# EAGLE board control board (EAGLE 9.7.0)
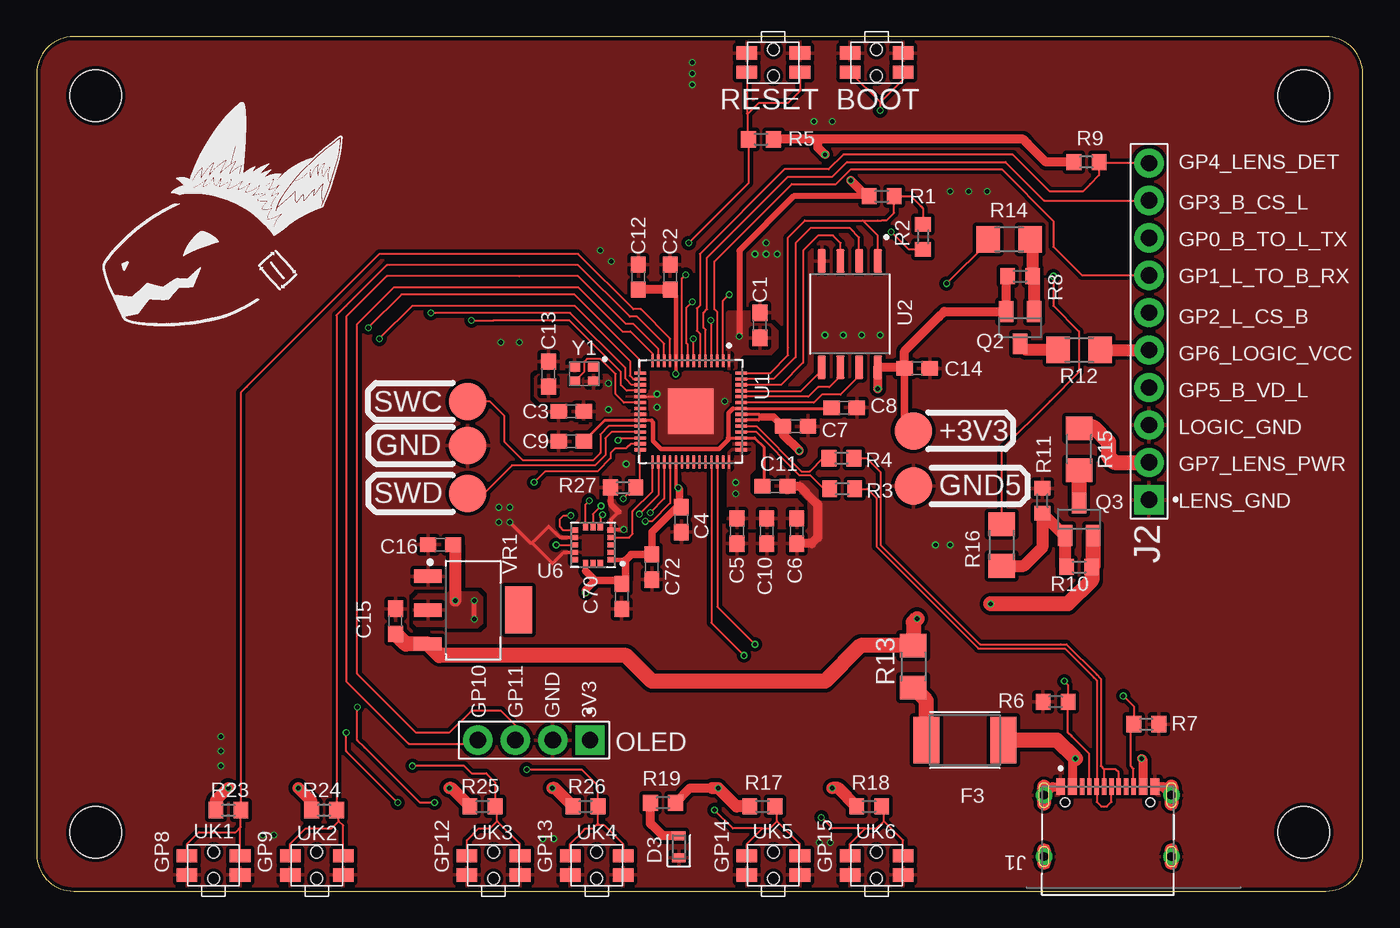
[diagram p0: board, top side]
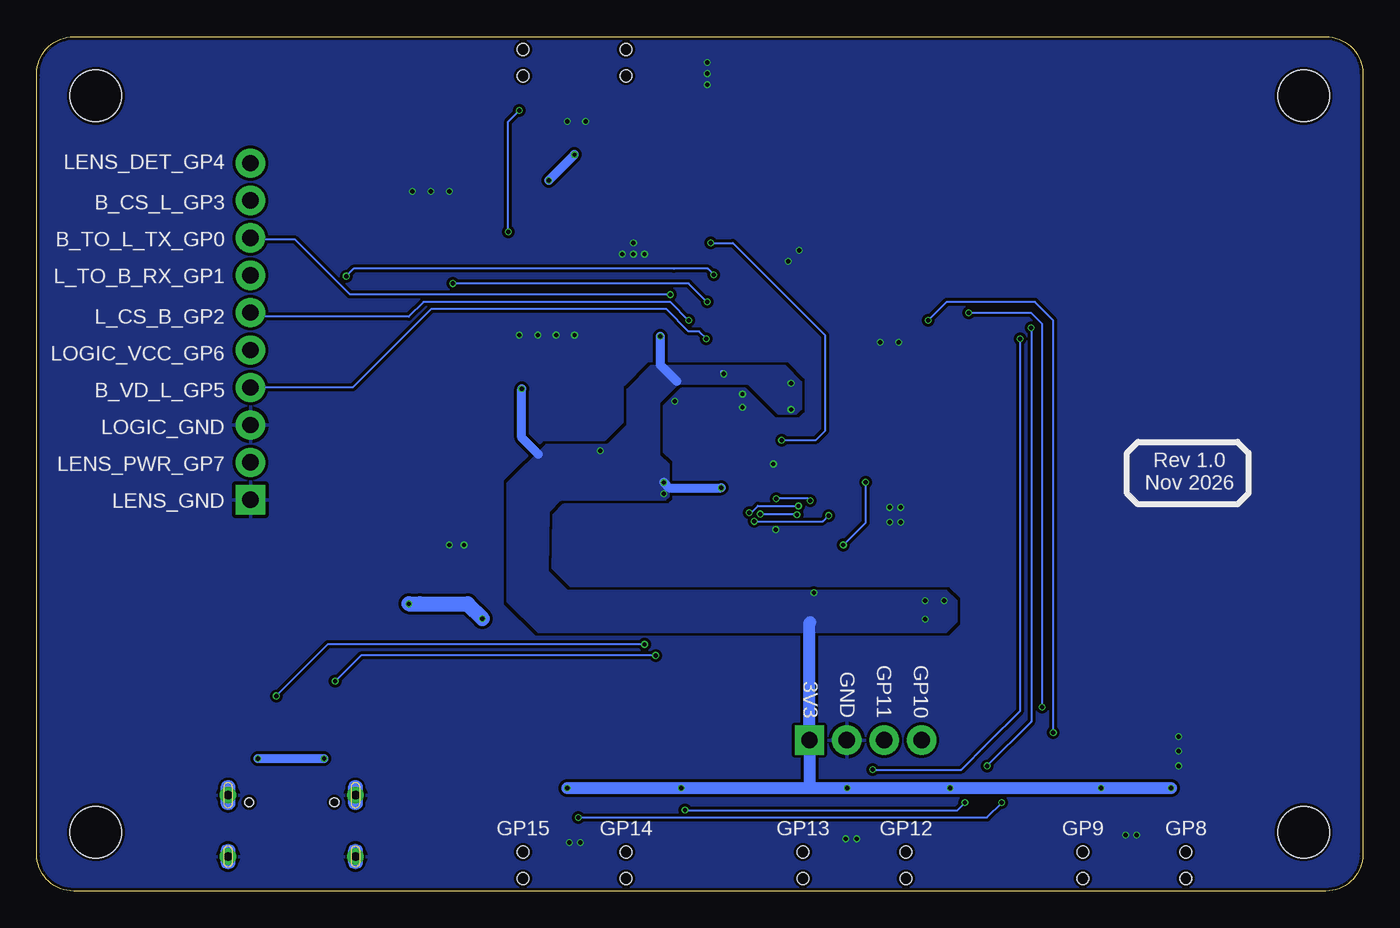
[diagram p1: board, bottom side, seen from below]

Size 90 x 58 mm. Coordinates in mm from the lower left corner, seen from the top.
Outline: 12.5,58 2.5,58 arc90 0,55.5 0,2.5 arc90 2.5,0 87.5,0 arc90 90,2.5 90,55.25 90,55.5 arc90 87.5,58 12.5,58
Copper layers (1*16): Top 0.035mm / dielectric 1.6mm / Bottom 0.035mm
Design rules "jlcpcb-2layers *": minimum track width 5mil, minimum drill 0.3mm, track to track 5mil, track to pad 5mil, pad to pad 5mil, via to via 5mil, smd to smd 5mil, copper to edge 0.2mm, drill to drill 6mil, minimum pad ring 10mil, minimum via ring 3mil, stop-mask expansion 0.038mm, vias tented up to drill 0.35mm, thermal gap 10mil
Holes 3.5 mm at 4,4 86,4 86,54 4,54

## Footprints (pad centres in the part's own frame; a part is rotated, then mirrored left to right if it is on the bottom)
B2,54 = smd 2.54 x 2.54: TP 0,0
SKSCLDE010 = smd 1.4 x 0.9: 1 -1.8,-0.65; 2 1.8,-0.65; 3 -1.8,0.65; 4 1.8,0.65 | hole 0.8: 0,0.9; 0,-0.9
C0603 = smd 1.1 x 1: 1 -0.85,0; 2 0.85,0
LEDC1608X35N_FLAT-B = smd 0.612 x 0.912: A 0.75,0; C -0.75,0
FUSC4532X125 = smd 1.78 x 3.15: 1 -2.615,0; 2 2.615,0
HRO_TYPE-C-31-M-12 = smd 0.6 x 1.14: A1_B12 -3.2,4.75; A4_B9 -2.4,4.75; B1_A12 3.2,4.75; B4_A9 2.4,4.75 | smd 0.3 x 1.14: A5 -1.25,4.75; A6 -0.25,4.75; A7 0.25,4.75; A8 1.25,4.75; B5 1.75,4.75; B6 0.75,4.75; B7 -0.75,4.75; B8 -1.75,4.75 | drill 0.6 pad 0.9: S1 -4.325,4.17; S2 4.325,4.17; S3 -4.325,0; S4 4.325,0 | hole 0.6: -2.89,3.68; 2.89,3.68
61301011121 = drill 1.1 square: 1 -11.43,0 | drill 1.1: 2 -8.89,0; 3 -6.35,0; 4 -3.81,0; 5 -1.27,0; 6 1.27,0; 7 3.81,0; 8 6.35,0; 9 8.89,0; 10 11.43,0
61300411121 = drill 1.1 square: 1 -3.81,0 | drill 1.1: 2 -1.27,0; 3 1.27,0; 4 3.81,0
SOT23 = smd 1 x 1.4: 1 -0.95,-1.1; 2 0.95,-1.1; 3 0,1.1
R0603 = smd 1 x 1.1: 1 -0.85,0; 2 0.85,0
R1206 = smd 1.6 x 1.803: 1 -1.422,0; 2 1.422,0
QFN40P700X700X90-57N = smd 0.84 x 0.2: 1 -3.435,2.6; 2 -3.435,2.2; 3 -3.435,1.8; 4 -3.435,1.4; 5 -3.435,1; 6 -3.435,0.6; 7 -3.435,0.2; 8 -3.435,-0.2; 9 -3.435,-0.6; 10 -3.435,-1; 11 -3.435,-1.4; 12 -3.435,-1.8; 13 -3.435,-2.2; 14 -3.435,-2.6; 29 3.435,-2.6; 30 3.435,-2.2; 31 3.435,-1.8; 32 3.435,-1.4; 33 3.435,-1; 34 3.435,-0.6; 35 3.435,-0.2; 36 3.435,0.2; 37 3.435,0.6; 38 3.435,1; 39 3.435,1.4; 40 3.435,1.8; 41 3.435,2.2; 42 3.435,2.6 | smd 0.2 x 0.84: 15 -2.6,-3.435; 16 -2.2,-3.435; 17 -1.8,-3.435; 18 -1.4,-3.435; 19 -1,-3.435; 20 -0.6,-3.435; 21 -0.2,-3.435; 22 0.2,-3.435; 23 0.6,-3.435; 24 1,-3.435; 25 1.4,-3.435; 26 1.8,-3.435; 27 2.2,-3.435; 28 2.6,-3.435; 43 2.6,3.435; 44 2.2,3.435; 45 1.8,3.435; 46 1.4,3.435; 47 1,3.435; 48 0.6,3.435; 49 0.2,3.435; 50 -0.2,3.435; 51 -0.6,3.435; 52 -1,3.435; 53 -1.4,3.435; 54 -1.8,3.435; 55 -2.2,3.435; 56 -2.6,3.435 | smd 3.1 x 3.1: 57 0,0
SOIC127P790X216-8N = smd 1.61 x 0.58: 1 -3.605,1.905; 2 -3.605,0.635; 3 -3.605,-0.635; 4 -3.605,-1.905; 5 3.605,-1.905; 6 3.605,-0.635; 7 3.605,0.635; 8 3.605,1.905
XDCR_LIS3DHTR = smd 0.45 x 0.35: 1 -1.225,1; 2 -1.225,0.5; 3 -1.225,0; 4 -1.225,-0.5; 5 -1.225,-1; 9 1.225,-1; 10 1.225,-0.5; 11 1.225,0; 12 1.225,0.5; 13 1.225,1 | smd 0.35 x 0.45: 6 -0.5,-1.225; 7 0,-1.225; 8 0.5,-1.225; 14 0.5,1.225; 15 0,1.225; 16 -0.5,1.225
SOT230P700X170-4 = smd 1.86 x 0.898: 1 -3.075,2.3; 2 -3.075,0; 3 -3.075,-2.3 | smd 1.86 x 3.189: 4 3.075,0
WE-SPXO_IQXO-540 = smd 0.75 x 0.65: 1 -0.65,-0.5; 2 0.65,-0.5; 3 0.65,0.5; 4 -0.65,0.5

## Placement (x,y rotation side)
+3V3  TPB2,54  [B2,54]  59.5,31.25 0 top
BOOT  [SKSCLDE010]  57,56.25 180 top
C1  100n  [C0603]  49.09,38.41 90 top
C2  100n  [C0603]  42.99,41.69 90 top
C3  100n  [C0603]  36.27,32.57 180 top
C4  100n  [C0603]  43.75,25.22 270 top
C5  100n  [C0603]  47.52,24.44 270 top
C6  100n  [C0603]  51.58,24.44 270 top
C7  100n  [C0603]  51.5,31.55 0 top
C8  100n  [C0603]  54.8,32.82 0 top
C9  100n  [C0603]  36.27,30.54 180 top
C10  1u  [C0603]  49.55,24.44 270 top
C11  1u  [C0603]  50.11,27.49 0 top
C12  10u  [C0603]  40.84,41.69 90 top
C13  100n  [C0603]  34.74,35.11 90 top
C14  100n  [C0603]  59.76,35.49 0 top
C15  10u  [C0603]  24.36,18.32 90 top
C16  10u  [C0603]  27.4,23.52 180 top
C70  100n  [C0603]  39.7,20 270 top
C72  10u  [C0603]  41.75,22 270 top
D3  LED_WHITE  [LEDC1608X35N_FLAT-B]  43.58,3 90 top
F3  1812L010  [FUSC4532X125]  63,10.25 180 top
GND  TPB2,54  [B2,54]  29.25,30.25 0 top
GND5  TPB2,54  [B2,54]  59.5,27.5 0 top
J1  TYPE-C-31-M-12  [HRO_TYPE-C-31-M-12]  72.69,2.35 0 top
J2  61301011121  [61301011121]  75.5,38 90 top
OLED  [61300411121]  33.75,10.25 180 top
Q2  SI2301CDS-T1-GE3  [SOT23]  66.75,38.25 180 top
Q3  SI2301CDS-T1-GE3  [SOT23]  70.75,25.25 0 top
R1  10k  [R0603]  57.34,47.17 180 top
R2  1K  [R0603]  60.15,44.41 90 top
R3  27R  [R0603]  54.67,27.31 0 top
R4  27R  [R0603]  54.62,29.39 0 top
R5  10k  [R0603]  49.16,51.04 0 top
R6  5.1k  [R0603]  69.15,12.85 0 top
R7  5.1k  [R0603]  75.32,11.33 180 top
R8  10k  [R0603]  66.75,41.75 180 top
R9  10k  [R0603]  71.25,49.5 180 top
R10  5.1k  [R0603]  70.75,22 180 top
R11  10k  [R0603]  68.25,26.5 270 top
R12  0  [R1206]  70.75,36.75 180 top
R13  0  [R1206]  59.5,15.25 90 top
R14  0  [R1206]  66,44.25 180 top
R15  0  [R1206]  70.75,30 270 top
R16  0  [R1206]  65.5,23.5 270 top
R17  10k  [R0603]  49.25,5.75 180 top
R18  10k  [R0603]  56.5,5.75 180 top
R19  5.1k  [R0603]  42.5,6 0 top
R23  10k  [R0603]  13,5.5 180 top
R24  10k  [R0603]  19.5,5.5 180 top
R25  10k  [R0603]  30.25,5.75 180 top
R26  10k  [R0603]  37.25,5.75 180 top
R27  10k  [R0603]  39.8,27.4 0 top
RESET  [SKSCLDE010]  50,56.25 180 top
SWC  TPB2,54  [B2,54]  29.25,33.25 0 top
SWD  TPB2,54  [B2,54]  29.25,27 0 top
U1  RP2040  [QFN40P700X700X90-57N]  44.39,32.57 270 top
U2  W25Q128JVSIQ  [SOIC127P790X216-8N]  55.19,39.17 270 top
U6  LIS3DHTR  [XDCR_LIS3DHTR]  37.75,23.5 180 top
U$2  CYCLESTARTV2MEDIUM  [CYCLESTARTV2MEDIUM]  13.5,45.75 0 top
UK1  [SKSCLDE010]  12,1.75 0 top
UK2  [SKSCLDE010]  19,1.75 0 top
UK3  [SKSCLDE010]  31,1.75 0 top
UK4  [SKSCLDE010]  38,1.75 0 top
UK5  [SKSCLDE010]  50,1.75 0 top
UK6  [SKSCLDE010]  57,1.75 0 top
VR1  NCP1117ST33T3G  [SOT230P700X170-4]  29.62,19.08 0 top
Y1  12MHz  [WE-SPXO_IQXO-540]  37.15,35.11 180 top

## Library data of the parts
+3V3 GND GND5 SWC SWD = testpad
BOOT RESET UK1-UK6 = alps; JLCPN: C115362
C1-C9 C13 C14 C70 = rcl; JLCPN: C14663; SPICEPREFIX: C
C10 C11 = rcl; JLCPN: C15849; SPICEPREFIX: C
C12 C15 C16 C72 = rcl; JLCPN: C19702; SPICEPREFIX: C
D3 = LED; CATEGORY: LED; COLOR: BLUE; DESCRIPTION: CHIP LED FLAT; JLCPN: C2290; SUB-CATEGORY: CHIP; TYPE: FLAT_TOP
F3 = Fuse; CATEGORY: FUSE; DESCRIPTION: Resettable PTCs; JLCPN: C127824; MANUFACTURER: Littlefuse; MPN: 1812L010; OPERATING_TEMPERATURE: -40°C to +85°C; PART_STATUS: ACTIVE; ROHS_COMPLIANCE: RoHS Compliant; SERIES: 1812L; SUBCATEGORY: Resettable; TYPE: PTC
J1 = SnapEDA Library; JLCPN: C165948; MANUFACTURER: HRO Electronics Co., Ltd.; MAXIMUM_PACKAGE_HEIGHT: 3.26 mm; PARTREV: 2020.12.08; SNAPEDA_PN: TYPE-C-31-M-12; STANDARD: Manufacturer Recommendations
J2 = Headers; CREATED_BY: PCBLayout.com; DIGIKEY_PART_NUMBER: 732-2670-ND; MANUFACTURER: Wurth Electronics Inc.; MPN: 61301011121
OLED = Headers; CREATED_BY: PCBLayout.com; DIGI_KEY_PART_NUMBER: 732-5317-ND; MANUFACTURER: Wurth Electronics Inc.; MPN: 61300411121
Q2 Q3 = Transistor; CATEGORY: Transistor; DESCRIPTION: MOSFET P-CH 30V 3A SOT-23; DRAIN_CURRENT: 3A; JLCPN: C10487; MANUFACTURER: Infineon Technologies; MPN: IRLML5203TRPBF; OPERATING_TEMP: -55°C ~ 150°C; PART_STATUS: Active; ROHS_COMPLIANT: Yes; SUB-CATEGORY: MOSFET; THERMALLOSS: 1.25W; TYPE: P-Channel
R1 R5 R8 R9 R11 R17 R18 R23-R27 = rcl; JLCPN: C25804; SPICEPREFIX: R
R2 = rcl; JLCPN: C21190; SPICEPREFIX: R
R3 R4 = rcl; JLCPN: C2907021; SPICEPREFIX: R
R6 R7 R10 R19 = rcl; JLCPN: C23186; SPICEPREFIX: R
R12-R16 = rcl; JLCPN: C17888; SPICEPREFIX: R
U1 = SnapEDA Library; JLCPN: C2040; MANUFACTURER: Raspberry Pi; MAXIMUM_PACKAGE_HEIGHT: 0.9 mm; PARTREV: 1.6.1; STANDARD: IPC 7351B
U2 = SnapEDA Library; JLCPN: C97521; MANUFACTURER: Winbond Electronics; PACKAGE: SOIC127P790X216-8N
U6 = LIS3DHTR; AVAILABILITY: In Stock; CHECK_PRICES: https://www.snapeda.com/parts/LIS3DHTR/STMicroelectronics/view-part/?ref=eda; DESCRIPTION: Accelerometer X, Y, Z Axis ±2g, 4g, 8g, 16g 0.5Hz ~ 625Hz 16-LGA (3x3); JLCPN: C15134; MF: STMicroelectronics; MP: LIS3DHTR; PACKAGE: LGA-16 STMicroelectronics; PRICE: None; PURCHASE-URL: https://www.snapeda.com/api/url_track_click_mouser/?unipart_id=278195&manufacturer=STMicroelectronics&part_name=LIS3DHTR&search_term=None; SNAPEDA_LINK: https://www.snapeda.com/parts/LIS3DHTR/STMicroelectronics/view-part/?ref=snap
U$2 = Logos
VR1 = IC_Power-Management; CATEGORY: IC_Power-Management; JLCPN: C6186; MANUFACTURER: ON Semiconductor; MPN: NCP1117ST33T3G; OPERATING_TEMP: 0 to +125 °C; PART_STATUS: Active; ROHS_COMPLIANT: RoHS3 Compliant; SERIES: NCP1117, NCV1117; SUB-CATEGORY: Voltage Regulator; TYPE: Linear
Y1 = Wurth_Quartz Crystals & Oscillators_WE-SPXO; DATASHEET-URL: https://www.we-online.com/catalog/datasheet/830208214609.pdf; JLCPN: C2901608; MOUNT: SMT; PART-NUMBER: 830208214609; STABILITY: 25ppm; V-SUPPLY: 3.3V

## Nets
+1V1: C8.1 C9.1 C11.1 U1.23 U1.45 U1.50
+3.3V: +3V3.TP C1.1 C2.1 C3.1 C4.1 C5.1 C6.1 C7.1 C10.1 C12.1 C13.1 C14.1 C16.1 C70.1 C72.1 OLED.1 Q2.2 R1.2 R5.2 R8.2 R9.2 R17.2 R18.2 R19.2 R23.2 R24.2 R25.2 R26.2 U1.1 U1.10 U1.22 U1.33 U1.42 U1.43 U1.44 U1.48 U1.49 U2.8 U6.1 U6.14 VR1.2 Y1.4
+5V: C15.1 Q3.2 R10.1 R13.2 VR1.3
AC_CK: U1.29 U6.4
AC_CS: R27.2 U1.28 U6.8
AC_INT0: U1.27 U6.11
AC_INT1: U1.32 U6.9
AC_SDI: U1.30 U6.6
AC_SDO: U1.31 U6.7
B_CS_L: J2.9 U1.5
B_TO_L_TXD: J2.8 U1.2
BODY_VD_LENS: J2.4 U1.7
GND: BOOT.1 BOOT.2 C1.2 C2.2 C3.2 C4.2 C5.2 C6.2 C7.2 C8.2 C9.2 C10.2 C11.2 C12.2 C13.2 C14.2 C15.2 C16.2 C70.2 C72.2 D3.C GND5.TP GND.TP J1.A1_B12 J1.B1_A12 J1.S1 J1.S2 J1.S3 J1.S4 J2.1 J2.3 OLED.2 R6.1 R7.1 R11.1 R27.1 RESET.1 RESET.2 U1.19 U1.57 U2.4 U6.5 U6.10 U6.12 UK1.1 UK1.2 UK2.1 UK2.2 UK3.1 UK3.2 UK4.1 UK4.2 UK5.1 UK5.2 UK6.1 UK6.2 VR1.1 Y1.2
L_CS_B: J2.6 U1.4
L_TO_B_RXD: J2.7 U1.3
LENS_DET: J2.10 R9.1 U1.6
LENS_PWR: J2.2 R15.1
LOGIC_VCC: J2.5 R12.1
N$1: D3.A R19.1
N$2: R14.2 U1.8
N$3: BOOT.3 BOOT.4 R2.1
N$4: R16.1 U1.9
N$5: R5.1 RESET.3 RESET.4 U1.26
N$6: Q2.3 R12.2
N$7: Q2.1 R8.1 R14.1
N$8: Q3.3 R15.2
N$9: Q3.1 R10.2 R11.2 R16.2
N$10: R17.1 U1.17 UK5.3 UK5.4
N$11: R18.1 U1.18 UK6.3 UK6.4
N$17: F3.1 J1.A4_B9 J1.B4_A9
N$20: R23.1 U1.11 UK1.3 UK1.4
N$108: R24.1 U1.12 UK2.3 UK2.4
N$109: R25.1 U1.15 UK3.3 UK3.4
N$110: R26.1 U1.16 UK4.3 UK4.4
OLSCL: OLED.3 U1.14
OLSDA: OLED.4 U1.13
QSPI_SCLK: U1.52 U2.6
QSPI_SD0: U1.53 U2.5
QSPI_SD1: U1.55 U2.2
QSPI_SD2: U1.54 U2.3
QSPI_SD3: U1.51 U2.7
QSPI_SS: R1.1 R2.2 U1.56 U2.1
SWCLK: SWC.TP U1.24
SWD: SWD.TP U1.25
USB1_N: R3.1 U1.46
USB1_P: R4.1 U1.47
USB2_N: J1.A7 J1.B7 R3.2
USB2_P: J1.A6 J1.B6 R4.2
USBCC1: J1.A5 R6.2 U1.39
USBCC2: J1.B5 R7.2 U1.40
VUSB: F3.2 R13.1
XIN: U1.20 Y1.3

## Tracks (layer width: path | path; a pad name or v marks a point on that pad's centre or on a via)
+1V1
  Top 0.203: C8.1 53.9,32.77 U1.50 47.26,32.77 | C9.1 38.56,31.97 U1.23 41.69,31.97 41.72,31.93 | C11.1 49.34,27.58 49.34,30.16 48.73,30.77 U1.45 46.95,30.77 46.91,30.77
  Top 0.305: 41.72,31.93 41.83,31.83 41.83,30.56 42.38,30.01 46.3,30.01 46.95,30.66 46.95,30.77 | 47.26,32.77 46.95,32.47 46.95,30.81 46.91,30.77
+3.3V  (via drill 0.3)
  Top 0.203: U1.49 49.04,32.37 49.22,32.19 49,31.97 U1.48 | 43.64,26.18 C4.1 | 43.39,40.44 C2.1 | U1.44 U1.43 | v43.38,35.11 43.39,35.12
  Top 0.254: U1.33 43.39,28.12 43.39,27.37 v43.55,27.37 | 43.39,35.12 U1.10
  Top 0.305: U1.10 43.39,40.44 | C4.1 43.45,26.07 | U6.1 39.95,22.5 40,22.5 | 40.25,22.75 40.35,22.85 | 39.45,21.1 C70.1 39.95,21.1 | U6.14 37.25,21.75 | v29.69,19.71 v29.69,18.46
  Top 0.406: R1.2 51.38,47.17 47.69,43.48 v47.69,37.67
  Top 0.508: v43.55,27.37 43.64,27.28 43.64,26.18 | 49.22,32.19 50.02,32.19 C7.1 | 43.45,26.07 41.75,24.37 C72.1 40.35,22.85 | 40.25,22.75 40,22.5 | 37.25,21.75 37.9,21.1 | 39.45,21.1 37.9,21.1 | 39.95,22.5 39.95,21.1 | 37.9,21.1 37.25,20.45 v37.25,20.25 | C14.1 58.91,31.84 +3V3.TP
  Top 0.61: C2.1 C12.1 | C7.1 50.65,31.01 v51.76,29.9 | v57.09,34.09 U2.8 58.83,35.57 C14.1 58.91,36.66 61.25,39 61.6,39.35 Q2.2 65.8,41.65 R8.2 | 56.65,47.33 R1.2 56.33,47.17 v55.25,48.25 | R9.2 68.5,49.5 67.25,50.75 66.96,51.04 53,51.04 | 53,51.04 R5.2 | 53,51.04 53,50.5 v53.5,50 | R19.2 44.35,7 45.85,7
  Top 0.813: C16.1 28.42,23.36 v28.42,19.71 | R18.2 54.4,7 v54,7 | v13,7 12.15,6.15 R23.2 | R24.2 18.65,6.1 v17.75,7 | R25.2 28.15,7 v28,7 | R26.2 35.15,7 v35,7 | 45.85,7 v46.25,7 47.5,5.75 R17.2
  Bottom 0.305: 43.5,35.24 v43.38,35.11
  Bottom 0.61: 55.95,29.65 57.09,30.79 v57.09,34.09 | v47.69,37.67 47.69,35.74 46.55,34.6 | v47.44,27.74 47.07,27.37 v43.55,27.37 | v53.5,50 v55.25,48.25
  Bottom 0.813: v54,7 v46.25,7 37.5,7 | 37.5,7 v35,7 v28,7 v17.75,7 v13,7 | 37.5,7 37.56,7.06 OLED.1 37.56,18.19 37.5,18.25
  other vias: 38.8,34.47 47.44,26.98 38.8,32.7
  pour Top (isolate 0.152): 47.26,30.14 47.25,30.11 46.88,29.74 46.88,25.23 47.47,24.64 52.02,24.64 52.02,26.18 51.6,26.6 48.84,26.6 48.82,26.61 48.39,27.03 48.38,27.06 48.38,28.27 48.39,28.29 48.76,28.66 48.76,30.25 48.42,30.59 47.34,30.59 47.26,30.51
  pour Top (rank 2): 49.83,38.48 49.07,38.48 49.04,38.52 49.04,39.02 48.69,39.38 46.95,39.38 46.73,39.15 46.73,35.51 46.83,35.41 47.42,35.41 47.52,35.51 47.52,36.02 47.93,36.43 49.83,36.43 50.3,36.9 50.3,38.01
  pour Bottom (isolate 0.254): 55.29,21.69 54.04,20.44 54.02,20.42 28.28,20.42 27.58,19.72 27.58,18.28 28.29,17.57 55.95,17.57 58.03,19.65 58.03,27.71 55.41,30.33 51.23,30.33 51.21,30.35 49.91,31.64 49.9,31.66 49.9,34.06 48.3,35.67 39.22,35.67 38.12,34.57 38.12,32.73 38.45,32.39 39.66,32.39 41.68,34.41 41.71,34.42 46.44,34.42 46.47,34.41 47.76,33.12 47.77,33.09 47.77,29.63 47.76,29.6 47.13,28.98 47.13,26.76 47.34,26.55 54.44,26.55 54.47,26.54 55.24,25.77 55.25,25.76 55.25,25.75 55.25,25.75 55.26,25.74 55.26,25.73 55.26,25.73 55.26,25.73 55.26,25.71 55.33,21.77 55.33,21.77 55.33,21.75 55.33,21.74 55.33,21.74 55.33,21.73 55.32,21.72 55.32,21.71 55.31,21.71 55.31,21.71 55.3,21.7 55.29,21.69
  pour Top: 36.34,33.25 36.35,33.22 36.35,32.09 36.43,32.01 39.02,32.01 39.14,32.13 39.17,32.14 41.31,32.14 41.39,32.22 41.39,32.54 41.31,32.62 40.18,32.62 40.16,32.63 39.12,33.67 39.11,33.7 39.11,34.7 38.77,35.03 34.01,35.03 33.8,34.82 33.8,33.62 34.14,33.28 36.29,33.28 36.31,33.27
  pour Top: 27.8,18.01 27.83,18 27.94,17.89 29.91,17.89 30.25,18.22 30.25,19.94 29.91,20.27 27.94,20.27 27.83,20.16 27.8,20.15 25.91,20.15 25.58,19.81 25.58,18.22 25.78,18.01
+5V  (via drill 0.3)
  Top 0.61: 71.7,22.1 R10.1
  Top 1.016: Q3.2 71.7,22.1 | R10.1 71.6,21.1 70,19.5 65.5,19.5 v64.75,19.5 | v59.75,18.5 59.5,18.25 R13.2 55.92,16.67 53.5,14.25 41.75,14.25 40,16 27.33,16 VR1.3 25.04,16.78 C15.1
  Bottom 1.016: v64.75,19.5 64,19.5 60.75,19.5 v59.75,18.5
AC_CK
  Top 0.152: U6.4 40.2,24 40.45,24.25 40.45,25.8 41.79,27.14 U1.29
AC_CS  (via drill 0.3)
  Top 0.152: U6.8 37.25,26.25 v37.5,26.5 | v39.8,26.65 40.55,27.4 R27.2 40.96,27.71 U1.28
  Bottom 0.152: v37.5,26.5 37.65,26.65 v39.8,26.65
AC_INT0  (via drill 0.3)
  Top 0.152: U1.27 40.32,30.37 40.05,30.1 40,30.05 39.25,30.05 38.95,29.75 38.95,29.5 38.95,29.4 38.05,28.5 34.5,28.5 v33.75,27.75 | v35.25,23.5 U6.11
  Bottom 0.152: v33.75,27.75 33.75,25 v35.25,23.5
AC_INT1  (via drill 0.3)
  Top 0.152: U1.32 42.99,26.34 41.75,25.1 v41.3,25.1 | U6.9 35.75,24.5 35.5,24.75 35.5,25.25 35.75,25.5 v36.25,25.5
  Bottom 0.152: v41.3,25.1 36.65,25.1 v36.25,25.5
AC_SDI  (via drill 0.3)
  Top 0.152: U1.30 42.19,26.89 v40.9,25.6 | v38.4,25.55 38.25,25.4 U6.6
  Bottom 0.152: v40.9,25.6 38.45,25.6 v38.4,25.55
AC_SDO  (via drill 0.3)
  Top 0.152: U1.31 42.59,26.64 v41.65,25.7 | v38.3,26.15 37.75,25.6 U6.7
  Bottom 0.152: v41.65,25.7 41.5,25.7 41.05,26.15 v38.3,26.15
B_CS_L
  Top 0.152: U1.5 45.39,38.11 45.25,38.25 45.25,39.25 45.5,39.5 45.5,43 51,48.5 54,48.5 55,49.5 65.75,49.5 68.36,46.89 J2.9
B_TO_L_TXD  (via drill 0.3)
  Top 0.152: U1.2 46.59,40.09 v47,40.5
  Bottom 0.152: J2.8 75.4,44.25 72.75,44.25 72.5,44.25 68.75,40.5 v47,40.5
BODY_VD_LENS  (via drill 0.3)
  Top 0.152: U1.7 44.59,37.46 v44.55,37.5
  Bottom 0.152: v44.55,37.5 45.05,38 45.75,38 47.25,39.5 63.25,39.5 64.5,38.25 68.56,34.19 J2.4
GND  (via drill 0.3)
  Top 0.152: U1.19 41.92,33.57 v42.1,33.75
  Top 0.254: 39.5,25.75 38.98,25.23 U6.5 39.02,24.55 v39.85,24.55 | U6.10 35.5,24 34.75,24.75 33.62,23.62 | 33.62,23.62 35,22.25 35.75,23 U6.12 | 33.62,23.62 33.52,23.62 v32.1,25.05
  Top 0.406: R27.1 38.95,26.3 39.5,25.75
  Top 0.61: J1.S2 76.44,7.1 J1.B1_A12 | J1.S1 68.95,7.1 J1.A1_B12 | C11.2 51.76,27.49 52.75,26.5 53,26.25 53,24 52.59,23.59 C6.2
  other vias: 49.5,43.25 50.25,43.25 48.75,43.25 49.5,44 42.1,32.85 46.7,33.25 53.5,37.75 54.75,37.75 56,37.75 57.25,37.75 62,47.5 63.25,47.5 64.5,47.5 40,29 31.35,25.05 31.35,26.05 32.1,26.05 15.35,3.8 16.1,3.8 34.35,3.55 35.1,3.55 53.85,3.3 53.1,3.3 44.5,56.25 44.5,55.5 44.5,54.75 12.5,8.5 12.5,9.5 12.5,10.5 61,23.5 62,23.5 52.75,52.25 54,52.25 39,42.75 38.25,43.5 32.75,37.25 31.5,37.25
  pour Top (isolate 0.152, rank 2, no thermals): 41.53,33.12 41.55,33.09 41.55,30.06 41.76,29.85 46.26,29.85 46.98,30.57 46.98,35.16 41.67,35.16 41.67,34.08 41.66,34.05 41.39,33.77 41.36,33.76 40.53,33.76 40.53,33.41 41.23,33.41 41.26,33.4
  pour Top (isolate 0.254, rank 6): -3.62,-2.87 92.83,-2.87 92.83,44.29 92.73,60.12 -3.62,60.12
  pour Bottom (isolate 0.2, rank 6): -1.3,-1.42 90.92,-1.42 90.92,58.92 -1.67,58.92 -1.3,17.14 -1.3,17.14 -1.3,17.13 -1.3,17.11 -1.3,17.11
L_CS_B  (via drill 0.3)
  Top 0.152: U1.4 45.79,38.71 v45.75,38.75
  Bottom 0.152: v45.75,38.75 47,40 63.75,40 64.75,39 75.48,39 J2.6
L_TO_B_RXD
  Top 0.152: U1.3 46.19,39.31 46,39.5 46,42.75 46.19,42.94 51.25,48 54.25,48 55.25,49 65.5,49 69,45.5 69,43.75 70.94,41.81 J2.7
LENS_DET
  Top 0.152: J2.10 72.17,49.43 R9.1 72.1,48.6 71.5,48 71,47.5 68.75,47.5 66.25,50 54.75,50 53.75,49 50.75,49 45,43.25 45,39.75 44.8,39.55 44.8,38.05 45,37.85 45,36.01 U1.6
LENS_PWR
  Top 0.813: 70.83,31.5 R15.1
  Top 1.016: 70.83,31.5 71.75,31.5 72.75,30.5 72.75,29.5 73.14,29.11 J2.2
LOGIC_VCC
  Top 0.813: 72.44,36.48 R12.1 75.48,36.75 J2.5
N$1
  Top 0.61: D3.A 42.49,3.75 41.75,4.5 41.65,4.6 R19.1
N$2  (via drill 0.3)
  Top 0.152: U1.8 44.19,37.11 44.1,37.2 44.1,39.6 v44.5,40 | v61.75,41.25 64.58,44.08 R14.2
  Bottom 0.152: v44.5,40 45.75,41.25 v61.75,41.25
N$3  (via drill 0.3)
  Top 0.152: R2.1 59.19,43.56 v58,44.75 | v57.25,53 57.25,53.55 | BOOT.3 58.8,55.1 57.25,53.55 | BOOT.4 57.25,53.55
  Bottom 0.152: v58,44.75 58,52.25 v57.25,53
N$4  (via drill 0.3)
  Top 0.152: U1.9 43.79,41.59 v44.05,41.85 | v69,41.75 69,39.75 70.75,38 70.75,35.25 68.75,33.25 65.5,30 R16.1
  Bottom 0.152: v44.05,41.85 44.45,42.25 46.75,42.25 68.5,42.25 v69,41.75
N$5  (via drill 0.3)
  Top 0.152: RESET.3 51.8,54.3 51,53.5 49,53.5 48.25,52.75 | 48.25,52.75 48.25,51.09 R5.1 48.3,48.05 v44.25,44 | RESET.4 48.2,52.8 48.25,52.75 | v39.45,30.6 39.62,30.77 U1.26
  Bottom 0.152: v44.25,44 42.75,44 36.5,37.75 36.5,31.25 37.15,30.6 v39.45,30.6
N$6
  Top 0.813: R12.2 67.15,36.75 Q2.3
N$7
  Top 0.813: Q2.1 67.7,41.65 R8.1 67.6,44.07 R14.1
N$8
  Top 1.016: R15.2 Q3.3
N$9
  Top 0.813: R16.2 67,22.08 68.25,23.33 R11.2 69.75,24.15 Q3.1 69.8,22.1 R10.2
N$10  (via drill 0.3)
  Top 0.152: UK5.3 48.2,3.2 49.25,4.25 | 49.25,4.25 49.75,4.25 50.25,4.75 | 50.25,4.75 50.25,5.6 R17.1 | UK5.4 51.8,3.2 50.25,4.75 | U1.17 40.38,34.37 40,34.75 39.95,34.8 39.95,35.5 36.2,39.25 31,39.25 v26.75,39.25 | 49.25,4.25 47.25,4.25 v46,5.5 | v27,6 26,6 22.25,9.75 21.75,10.25 v21.75,12.5
  Bottom 0.152: v46,5.5 27.5,5.5 v27,6 | v21.75,12.5 21.75,38.5 22.5,39.25 v26.75,39.25
N$11  (via drill 0.3)
  Top 0.152: UK6.3 55.2,3.2 56.25,4.25 | 56.25,4.25 57,4.25 57.5,4.75 | 57.5,4.75 57.5,5.6 R18.1 | UK6.4 58.8,3.45 57.5,4.75 | U1.18 40.03,33.97 39.65,34.35 39.65,35.25 36.15,38.75 31,38.75 v29.5,38.75 | 56.25,4.25 54,4.25 v53.25,5 | v24.5,6 21,9.5 v21,10.75
  Bottom 0.152: v53.25,5 27.5,5 25.5,5 v24.5,6 | v21,10.75 21,38.75 22.25,40 28.25,40 v29.5,38.75
N$17  (via drill 0.3)
  Top 0.61: J1.B4_A9 75.09,8.9 v75,9 | v70.5,9 70.3,8.79 J1.A4_B9
  Top 1.016: v70.5,9 69.25,10.25 F3.1
  Bottom 0.61: v75,9 v70.5,9
N$20
  Top 0.152: UK1.3 10.2,3.2 11,4 13.5,4 13.85,4.35 | 13.85,4.35 R23.1 13.85,33.85 14.25,34.25 23.25,43.25 36.75,43.25 40.5,39.5 41,39.5 42.99,37.51 U1.11 | UK1.4 13.8,4.3 13.85,4.35
N$108
  Top 0.152: UK2.3 17.2,3.2 18.25,4.25 20,4.25 20.5,4.75 | 20.5,4.75 20.5,5.35 R24.1 20.35,39.1 21,39.75 23.75,42.5 36.75,42.5 40.25,39 40.75,39 42.59,37.16 U1.12 | UK2.4 20.8,4.45 20.5,4.75
N$109  (via drill 0.3)
  Top 0.152: UK3.3 29.2,3.45 30,4.25 30.75,4.25 31.25,4.75 | 31.25,4.75 31.25,5.6 R25.1 31.1,7.4 31,7.5 30.5,8 29.5,8 29,8.5 v25.5,8.5 | UK3.4 32.8,3.2 31.25,4.75 | U1.15 40.96,36.04 39.5,37.5 36.5,40.5 24.75,40.5 v22.5,38.25
  Bottom 0.152: v22.5,38.25 22.5,11.5 v25.5,8.5
N$110  (via drill 0.3)
  Top 0.152: UK4.3 36.2,3.2 37,4 37.25,4.25 37.75,4.25 38,4.5 | 38,4.5 38.1,4.6 R26.1 38.1,7.15 37,8.25 v33.25,8.25 | 38,4.5 38.5,4.5 39.75,3.25 39.8,3.2 UK4.4 | v23.25,37.5 25.5,39.75 36,39.75 36.5,39.75 40.25,36 40.25,35 40.5,34.75 40.94,34.75 U1.16
  Bottom 0.152: v33.25,8.25 27.25,8.25 25.5,10 23.25,12.25 v23.25,37.5
OLSCL
  Top 0.152: OLED.3 32.48,11.27 31.5,12.25 29.5,12.25 28,10.75 25.75,10.75 21.75,14.75 21.75,38.5 24.25,41 36.75,41 39.75,38 40.3,38 41.79,36.5 U1.14
OLSDA
  Top 0.152: U1.13 42.19,36.81 40.5,38.5 40,38.5 36.75,41.75 32.75,41.75 23.75,41.75 21,39 21,14.25 25.25,10 29.69,10 OLED.4
QSPI_SCLK
  Top 0.152: U2.6 54.55,34.98 53.79,34.22 53.03,34.22 52.38,33.57 U1.52
QSPI_SD0
  Top 0.152: U1.53 51.88,33.97 52.52,34.6 53.28,35.36 U2.5
QSPI_SD1
  Top 0.152: U2.2 55.82,44.38 55.19,45.02 52.52,45.02 51.5,44 51.5,36.25 50.02,34.77 U1.55
QSPI_SD2
  Top 0.152: U2.3 54.55,44 54.04,44.51 53.03,44.51 52.01,43.49 52.01,35.87 50.51,34.37 U1.54
QSPI_SD3
  Top 0.152: U2.7 55.82,34.98 54.55,33.71 53.28,33.71 52.74,33.17 U1.51
QSPI_SS
  Top 0.152: 56.08,45.52 52.14,45.52 50.99,44.38 50.99,36.89 50.99,36.38 49.78,35.17 U1.56 | 56.08,45.52 57.09,45.52 57.34,45.52 57.69,45.52 58.2,46.03 R1.1 59.33,47.17 60,46.5 60.15,46.35 R2.2 | U2.1 57.09,44.51 56.08,45.52
SWCLK
  Top 0.152: U1.24 38.82,31.57 38.25,31 38.25,29.75 37.75,29.25 33,29.25 31.75,30.5 31.75,32.25 30.75,33.25 SWC.TP
SWD
  Top 0.152: U1.25 39.02,31.17 38.6,30.75 38.6,29.6 37.9,28.9 32.25,28.9 30.35,27 SWD.TP
USB1_N
  Top 0.152: U1.46 48.84,31.17 51.78,28.23 52.51,28.23 53.42,27.31 R3.1
USB1_P
  Top 0.152: U1.47 48.83,31.57 51.9,28.5 52.48,28.5 53.37,29.39 R4.1
USB2_N
  Top 0.152: R3.2 56.38,27.31 57,26.69 57,23.5 57,23.38 63.91,16.47 69.5,16.47 69.78,16.47 71.75,14.5 71.94,14.3 J1.B7 71.94,6.05 72.25,5.75 72.65,5.75 72.94,6.04 J1.A7
USB2_P
  Top 0.152: R4.2 56.33,29.39 57.28,28.44 57.28,23.5 64.03,16.75 69.5,16.75 69.89,16.75 71.95,14.7 72.22,14.42 72.22,8.5 72.44,8.28 | 72.44,8.28 J1.A6 | J1.B6 73.44,8.05 73.25,8.25 73.22,8.28 72.44,8.28
USBCC1  (via drill 0.3)
  Top 0.152: J1.A5 71.44,9.3 70.25,10.5 70,10.75 70,12.75 | 70,12.75 R6.2 | U1.39 45.79,18.21 v48,16 | v69.75,14.25 70,14 70,12.75
  Bottom 0.152: v48,16 68,16 v69.75,14.25
USBCC2  (via drill 0.3)
  Top 0.152: J1.B5 74.44,8.3 74.25,8.5 74.25,11.12 R7.2 74.47,12.53 v73.75,13.25 | U1.40 46.19,19.31 v48.75,16.75
  Bottom 0.152: v48.75,16.75 70.25,16.75 v73.75,13.25
VUSB
  Top 1.016: F3.2 60.38,12.94 R13.1
XIN
  Top 0.152: U1.20 39.85,33.17 39.29,33.74 39.29,35.11 38.26,36.14 37.34,36.14 37.13,35.92 37.13,35.24 Y1.3

## Text on the board
tPlace: GP4_LENS_DET | GP3_B_CS_L | GP0_B_TO_L_TX | GP1_L_TO_B_RX | GP2_L_CS_B | GP6_LOGIC_VCC | GP5_B_VD_L | LOGIC_GND | GP7_LENS_PWR | LENS_GND | GP10 | GP11 | GND | 3V3 | GP8 | GP9 | GP12 | GP13 | GP14 | GP15
bPlace: LENS_DET_GP4 | B_CS_L_GP3 | B_TO_L_TX_GP0 | L_TO_B_RX_GP1 | L_CS_B_GP2 | LOGIC_VCC_GP6 | B_VD_L_GP5 | LOGIC_GND | LENS_PWR_GP7 | Rev 1.0 / Nov 2026 | LENS_GND | GP10 | GP11 | GND | 3V3 | GP8 | GP9 | GP12 | GP13 | GP14 | GP15